# Altium PCB PCB.PcbDoc (part 4 of 7)
Units mm, origin at the board's own origin, x right, y up, seen from the top; angles counter-clockwise.
Board outline 78.8 x 69 mm, 12 copper layers (Top Layer, GND_12, uStrip1, GND_35, Clocks, GND_57, POWER, Slow_Ctrl, GND_810, uStrip2, GND_1012, Bottom Layer), stack 2.926 mm thick; 290 components, 212 nets, 1379 pads, 3418 vias.
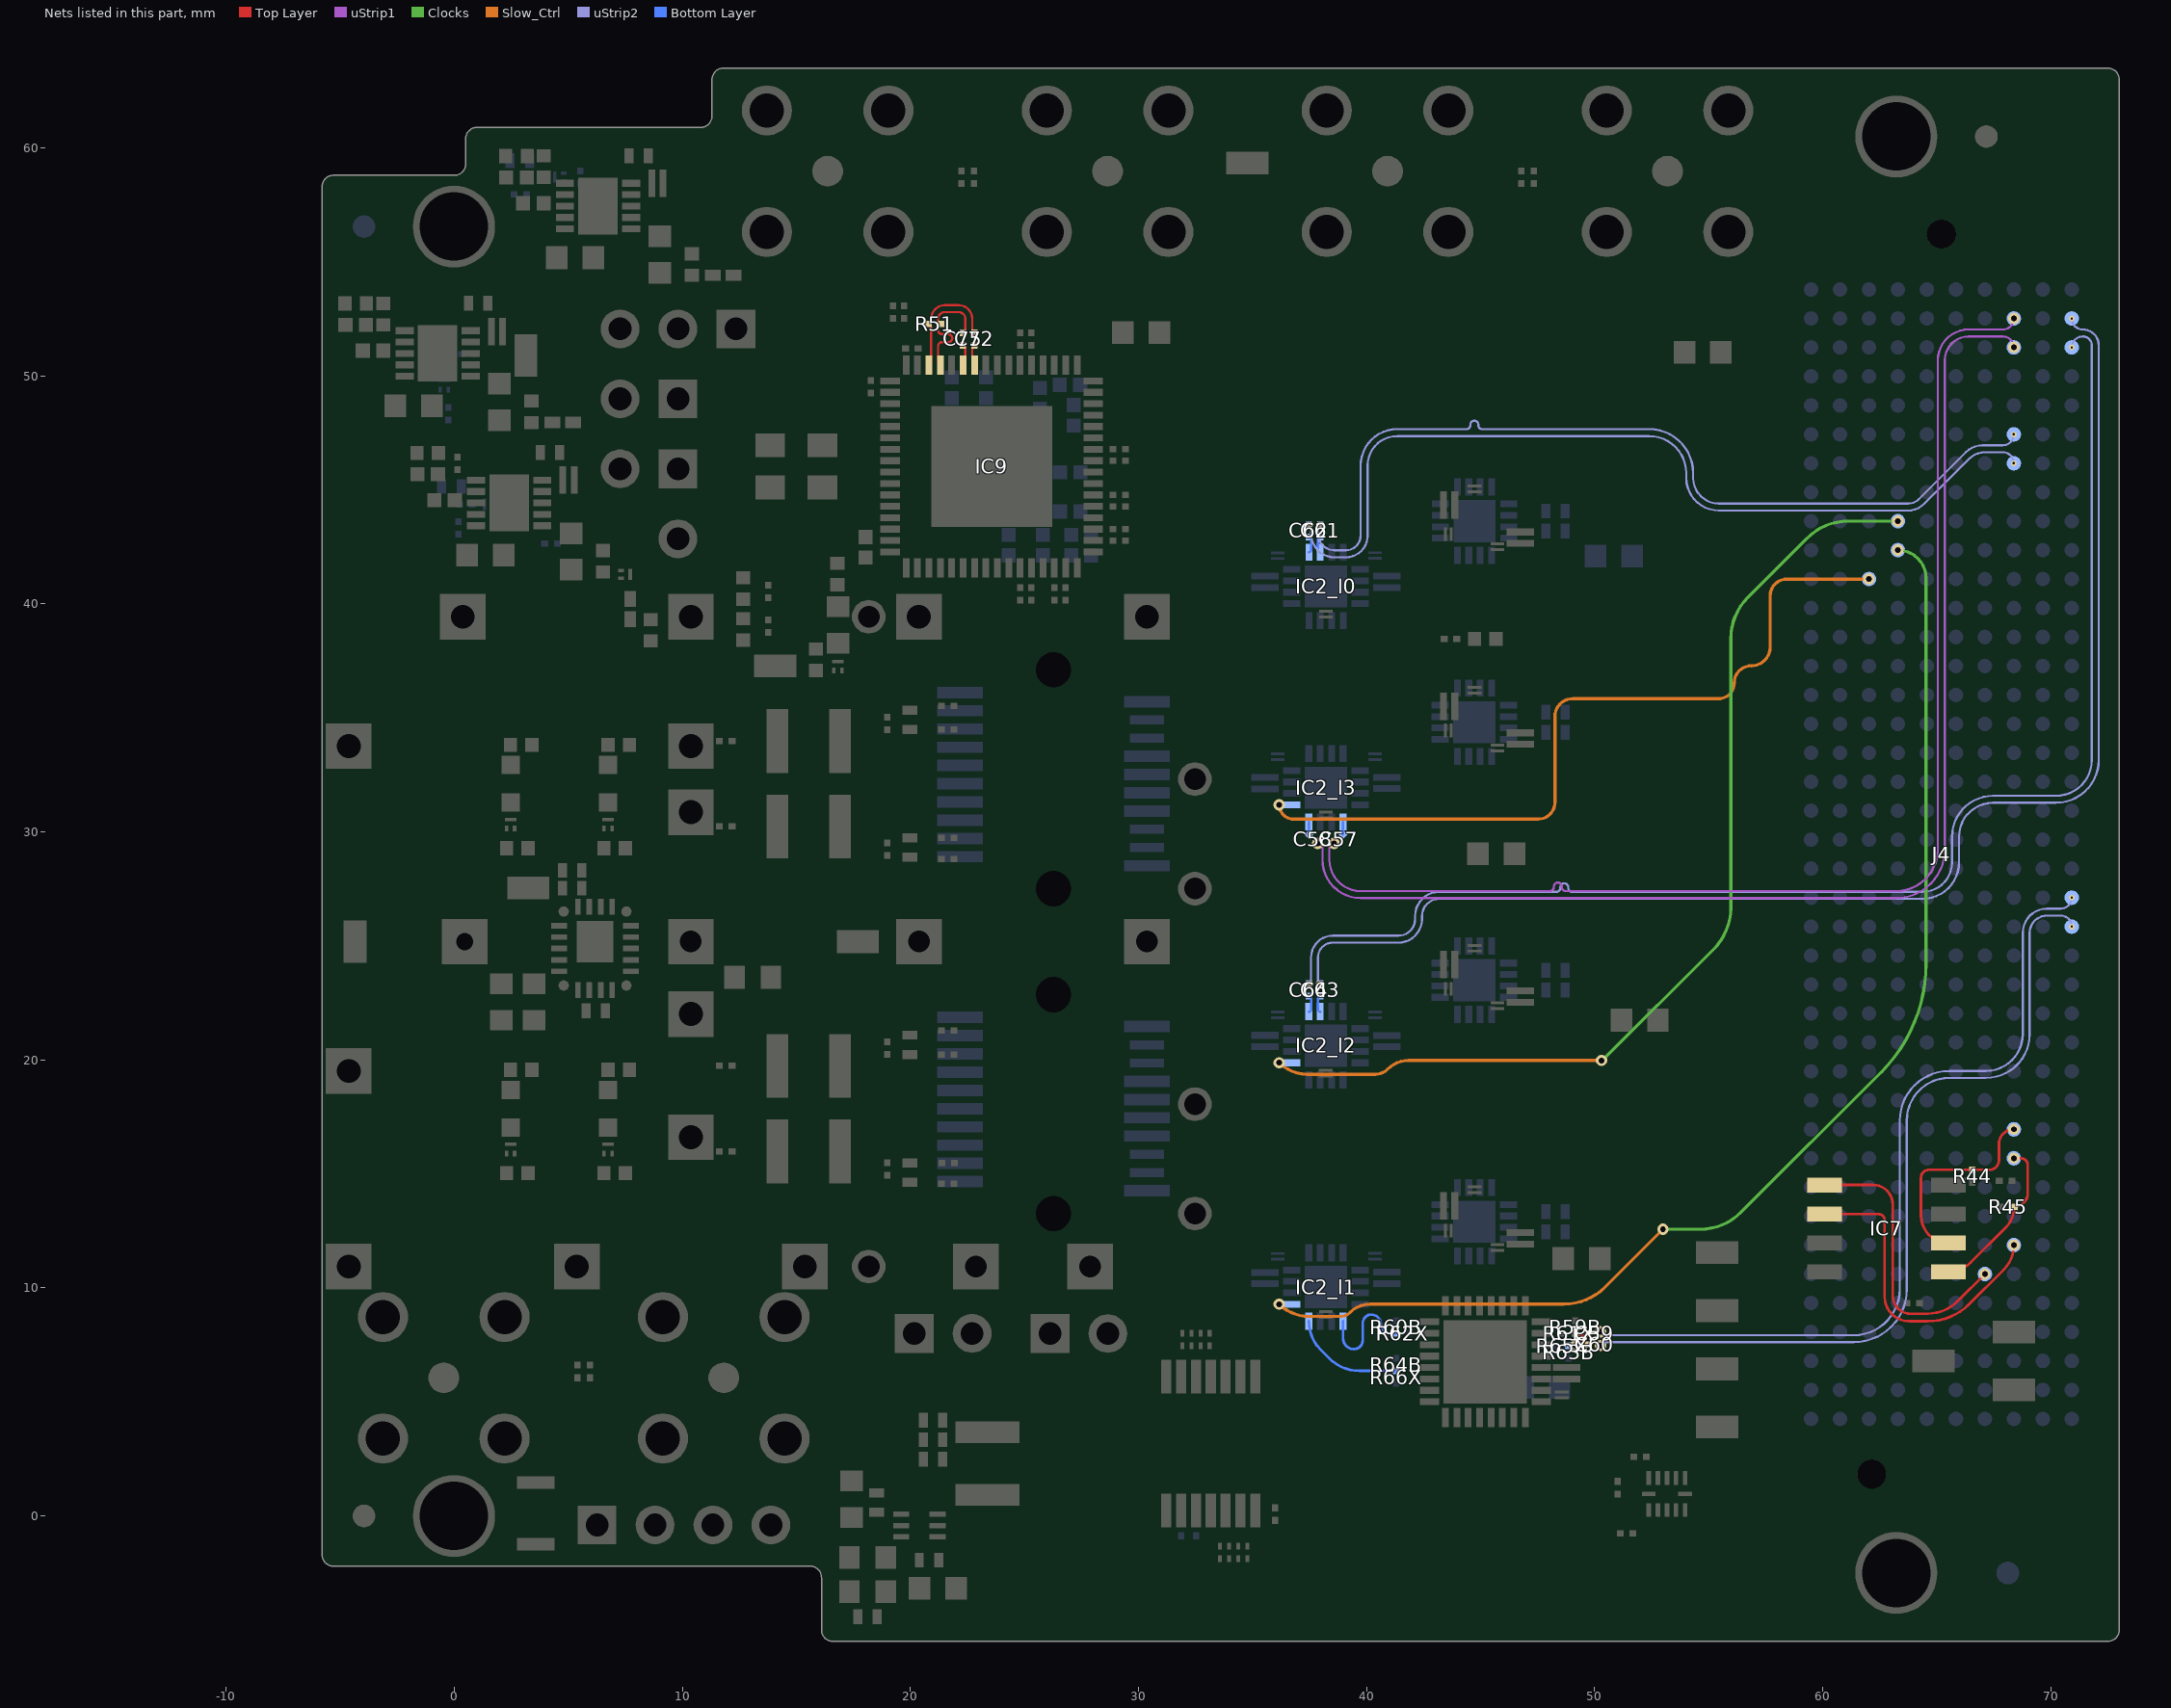
[diagram p13: the nets of this part, all layers, seen from the top]

## Via types
v1: diameter 0.25, hole 0.1, Top Layer to uStrip1, tented both sides, 895 vias
v2: diameter 0.25, hole 0.1, uStrip2 to Bottom Layer, tented both sides, 888 vias
v3: diameter 0.5, hole 0.25, Top Layer to Bottom Layer, tented both sides, 768 vias
v4: diameter 0.5, hole 0.25, Top Layer to Bottom Layer, 545 vias
v5: diameter 0.5, hole 0.25, uStrip1 to uStrip2, tented both sides, 315 vias
v6: diameter 0.584, hole 0.483, Top Layer to Bottom Layer, tented both sides, 6 vias
v7: diameter 0.5, hole 0.25, uStrip1 to uStrip2, 1 vias

## Nets (pads, with @x,y where several pads share a name; then routed paths per layer and width w, separated by ;. In a path a pad name is that pad's centre, name@x,y a point inside that pad or via, vN(x,y) a via of type N, cw(c..) or ccw(c..) an arc to the next point about the centre after c; other vN are vias at no path point) (continued)
EQ1_EN: IC2_l1.5 J4.G10 | length 54.8
  Clocks w0.137: v3(52.994,12.578) 54.623,12.578 ccw(c54.623,15.118) 56.419,13.322 62.554,19.456 ccw(c57.776,24.234) 64.533,24.234 64.533,41.125 ccw(c63.298,41.125) v3(63.298,42.36)
  Slow_Ctrl w0.137: v3(36.173,9.289) ccw(c37.472,10.588) 37.472,8.751 38.841,8.751 ccw(c38.841,9.371) 39.28,8.932 cw(c40.14,8.072) 40.14,9.289 48.653,9.289 ccw(c48.653,11.829) 49.161,9.34 ccw(c48.653,11.829) 50.449,10.033 v3(52.994,12.578)
EQ2_EN: IC2_l2.5 J4.G9 | length 45
  Clocks w0.137: v3@50.326,19.973 55.225,24.872 ccw(c53.429,26.668) 55.969,26.668 55.969,38.486 cw(c58.509,38.486) 56.713,40.282 59.317,42.886 cw(c61.113,41.09) 61.113,43.63 v3(63.298,43.63)
  Slow_Ctrl w0.137: v3(36.173,19.878) ccw(c37.394,21.099) 37.394,19.372 40.378,19.372 ccw(c40.378,20.143) 40.924,19.598 cw(c41.843,18.679) 41.843,19.979 v3(50.307,19.979)
EQ3_EN: IC2_l3.5 J4.H11 | length 34.8
  Slow_Ctrl w0.137: v3(36.173,31.19) ccw(c36.801,31.19) 36.801,30.562 47.519,30.562 ccw(c47.519,31.3) 48.257,31.3 48.257,35.066 cw(c49.032,35.066) 49.032,35.841 55.426,35.841 ccw(c55.426,36.533) 56.118,36.533 cw(c56.873,36.533) 56.873,37.288 ccw(c56.873,38.105) 57.69,38.105 57.69,40.348 cw(c58.432,40.348) 58.432,41.09 v3(62.028,41.09)
FB_IN_N: C75.1 IC9.61 R51.1 | length 5.2
  Top Layer w0.099: IC9.61@21.236,50.553 21.211,50.578 21.211,50.901 21.211,51.304 cw(c21.387,51.304) 21.387,51.481 21.652,51.481 ccw(c21.652,51.657) 21.652,51.834 21.387,51.834 cw(c21.387,52.01) 21.211,52.01 21.211,52.154 R51.1@21.333,52.277 21.211,52.4 21.211,52.498 cw(c21.513,52.498) 21.513,52.8 22.108,52.8 cw(c22.108,52.503) 22.406,52.503 22.406,52.323 22.406,51.996 C75.1@22.309,51.898
FB_IN_P: C72.1 IC9.62 R51.2 | length 5.2
  Top Layer w0.099: IC9.62@20.881,50.553 20.906,50.578 20.906,51.668 20.906,52.154 R51.2@20.783,52.277 20.906,52.4 20.906,52.498 cw(c21.513,52.498) 21.513,53.105 22.108,53.105 cw(c22.108,52.503) 22.711,52.503 22.711,52.197 22.711,51.996 C72.1@22.808,51.898
FB_OUT_N: C75.2 IC9.59 | length 0.7
  Top Layer w0.099: C75.2@22.309,51.348 22.406,51.251 22.406,50.681 IC9.59@22.381,50.656
FB_OUT_P: C72.2 IC9.58 | length 0.7
  Top Layer w0.099: IC9.58@22.736,50.656 22.711,50.681 22.711,51.251 C72.2@22.808,51.348
FMC_GA0: IC7.2 J4.C34 | length 14
  Top Layer w0.117: IC7.2@60.079,13.238 62.459,13.238 cw(c62.459,12.982) 62.715,12.982 62.715,9.607 ccw(c63.783,9.607) 63.783,8.539 64.612,8.539 ccw(c64.612,11.079) 66.408,9.283 67.934,10.809 ccw(c66.863,11.88) v3(68.378,11.88)
FMC_GA1: IC7.1 J4.D35 | length 12.6
  Top Layer w0.117: IC7.1@60.079,14.518 62.208,14.518 cw(c62.208,13.653) 63.073,13.653 63.073,9.647 ccw(c63.846,9.647) 63.846,8.874 64.597,8.874 ccw(c64.597,10.746) 65.92,9.423 v3(67.108,10.61)
FMC_SCL: IC7.6 J4.C30 R44.1 | length 9.1
  Top Layer w0.117: IC7.6@65.503,11.978 cw(c65.503,13.171) 64.309,13.171 64.309,14.838 cw(c64.653,14.838) 64.653,15.182 R44.1@66.552,15.182 67.308,15.182 ccw(c67.308,15.597) 67.723,15.597 67.723,16.306 cw(c68.378,16.306) v3(68.378,16.96)
FMC_SDA: IC7.5 J4.C31 R45.1 | length 7.2
  Top Layer w0.117: IC7.5@65.503,10.708 ccw(c65.503,12.1) 66.487,11.116 68.015,12.643 ccw(c67.093,13.565) R45.1@68.397,13.565 ccw(c68.397,14.158) 68.99,14.158 68.99,15.392 ccw(c68.692,15.392) 68.692,15.69 v3(68.378,15.69)
FPGA_RX0_C_N: C62.1 J4.C7 | length 39.4
  uStrip2 w0.094: v2(37.542,43.484) 37.567,43.459 37.567,43.072 37.567,43.062 ccw(c38.601,43.082) 38.441,42.06 ccw(c38.601,43.082) 38.601,42.048 39.096,42.048 ccw(c39.096,42.996) 40.044,42.996 40.044,46.066 cw(c41.339,46.066) 41.339,47.362 52.392,47.362 cw(c52.392,45.741) 54.013,45.741 54.013,45.529 ccw(c55.443,45.529) 55.443,44.099 63.754,44.099 ccw(c63.754,45.054) 64.429,44.378 66.406,46.355 cw(c67.124,45.637) 67.124,46.653 67.895,46.653 cw(c67.895,46.17) v2(68.378,46.17)
FPGA_RX0_C_P: C61.1 J4.C6 | length 39.3
  uStrip2 w0.094: v2(37.896,43.484) 37.871,43.459 37.871,43.082 ccw(c38.601,43.082) 38.601,42.353 39.096,42.353 ccw(c39.096,42.996) 39.739,42.996 39.739,46.066 cw(c41.339,46.066) 41.339,47.667 43.918,47.667 44.376,47.667 ccw(c44.376,47.841) 44.55,47.841 44.55,47.862 cw(c44.724,47.862) 44.898,47.862 44.898,47.841 ccw(c45.072,47.841) 45.072,47.667 45.467,47.667 52.392,47.667 cw(c52.392,45.741) 54.318,45.741 54.318,45.529 ccw(c55.443,45.529) 55.443,44.403 63.752,44.403 ccw(c63.752,45.057) 64.214,44.595 66.28,46.66 cw(c66.998,45.942) 66.998,46.957 67.895,46.957 ccw(c67.895,47.44) v2(68.378,47.44)
FPGA_RX0_N: C62.2 IC2_l0.9 | length 0.8
  Bottom Layer w0.099: IC2_l0.9@37.469,42.266 ccw(c37.469,42.364) 37.567,42.364 37.567,42.836 ccw(c37.469,42.836) C62.2@37.469,42.934
FPGA_RX0_P: C61.2 IC2_l0.10 | length 0.8
  Bottom Layer w0.099: IC2_l0.10@37.969,42.266 cw(c37.969,42.364) 37.872,42.364 37.872,42.836 cw(c37.969,42.836) C61.2@37.969,42.934
FPGA_RX1_C_N: C64.1 J4.A3 | length 60.9
  uStrip2 w0.094: v2(37.541,23.344) ccw(c37.541,23.368) 37.565,23.368 37.565,24.502 cw(c38.514,24.502) 38.514,25.451 41.396,25.451 ccw(c41.396,26.182) 42.127,26.182 42.127,26.316 cw(c43.182,26.316) 43.182,27.371 48.272,27.371 48.319,27.371 ccw(c48.319,27.545) 48.493,27.545 48.493,27.573 cw(c48.667,27.573) 48.841,27.573 48.841,27.545 ccw(c49.015,27.545) 49.015,27.371 49.484,27.371 49.531,27.371 64.371,27.371 ccw(c64.371,28.671) 65.672,28.671 65.672,29.796 cw(c67.461,29.796) 67.461,31.585 70.225,31.585 ccw(c70.225,33.158) 71.798,33.158 71.798,51.334 ccw(c71.4,51.334) 71.4,51.733 ccw(c71.4,51.25) v2(70.918,51.25)
FPGA_RX1_C_P: C63.1 J4.A2 | length 60.9
  uStrip2 w0.094: v2(37.895,23.344) cw(c37.895,23.368) 37.87,23.368 37.87,24.502 cw(c38.514,24.502) 38.514,25.146 41.396,25.146 ccw(c41.396,26.182) 42.432,26.182 42.432,26.316 cw(c43.182,26.316) 43.182,27.066 64.371,27.066 ccw(c64.371,28.671) 65.977,28.671 65.977,29.796 cw(c67.461,29.796) 67.461,31.28 70.225,31.28 ccw(c70.225,33.158) 72.103,33.158 72.103,51.334 ccw(c71.4,51.334) 71.4,52.037 cw(c71.4,52.52) v2(70.918,52.52)
FPGA_RX1_N: C64.2 IC2_l2.9 | length 0.8
  Bottom Layer w0.099: IC2_l2.9@37.468,22.108 ccw(c37.468,22.205) 37.565,22.205 37.565,22.678 ccw(c37.468,22.678) C64.2@37.468,22.776
FPGA_RX1_P: C63.2 IC2_l2.10 | length 0.8
  Bottom Layer w0.099: IC2_l2.10@37.968,22.108 cw(c37.968,22.205) 37.87,22.205 37.87,22.678 cw(c37.968,22.678) C63.2@37.968,22.776
FPGA_TX0_C_N: C58.1 IC2_l3.4 | length 0.6
  Bottom Layer w0.099: C58.1@37.468,29.881 IC2_l3.4@37.468,30.44
FPGA_TX0_C_P: C57.1 IC2_l3.1 | length 0.6
  Bottom Layer w0.099: C57.1@38.968,29.881 IC2_l3.1@38.968,30.44
FPGA_TX0_N: C58.2 J4.C3 | length 55.6
  uStrip1 w0.094: v2(37.857,29.492) cw(c37.857,29.283) 38.065,29.283 38.065,28.778 ccw(c39.744,28.778) 39.744,27.1 63.213,27.1 ccw(c63.213,29.238) 65.351,29.238 65.351,50.689 cw(c66.395,50.689) 66.395,51.733 67.895,51.733 cw(c67.895,51.25) v5(68.378,51.25)
  other v2: 68.378,51.25
  other v5: 37.857,29.492
FPGA_TX0_P: C57.2 J4.C2 | length 55.6
  uStrip1 w0.094: v2(38.579,29.492) ccw(c38.579,29.283) 38.37,29.283 38.37,28.778 ccw(c39.744,28.778) 39.744,27.405 47.628,27.405 48.037,27.405 ccw(c48.037,27.579) 48.211,27.579 48.211,27.605 cw(c48.385,27.605) 48.559,27.605 48.559,27.579 ccw(c48.733,27.579) 48.733,27.405 49.128,27.405 63.213,27.405 ccw(c63.213,29.238) 65.046,29.238 65.046,50.691 cw(c66.392,50.691) 66.392,52.037 67.895,52.037 ccw(c67.895,52.52) v2(68.378,52.52)
  other v5: 38.579,29.492 68.378,52.52
FPGA_TX1_C_N: C60.1 R63B.2 R65X.2 | length 0.7
  Top Layer w0.099: v3@49.153,7.513 cw(c49.251,7.513) 49.251,7.61 49.614,7.61 cw(c49.614,7.513) C60.1@49.711,7.513
  other v3: 49.155,7.464
FPGA_TX1_C_P: C59.1 R59B.1 R61X.2 | length 0.7
  Top Layer w0.099: R59B.1@49.153,8.013 ccw(c49.251,8.013) 49.251,7.915 49.614,7.915 ccw(c49.614,8.013) C59.1@49.711,8.013
FPGA_TX1_N: C60.2 J4.A23 | length 36.8
  uStrip2 w0.094: v5(50.261,7.476) cw(c50.41,7.476) 50.41,7.624 61.361,7.624 ccw(c61.361,9.949) 63.686,9.949 63.686,17.349 cw(c65.552,17.349) 65.552,19.215 67.155,19.215 ccw(c67.155,21.134) 69.074,21.134 69.074,25.579 cw(c69.827,25.579) 69.827,26.333 70.435,26.333 cw(c70.435,25.85) v2(70.918,25.85)
  other v1: 50.261,7.476
FPGA_TX1_P: C59.2 J4.A22 | length 36.8
  uStrip2 w0.094: v5(50.261,8.078) ccw(c50.41,8.078) 50.41,7.929 61.361,7.929 ccw(c61.361,9.949) 63.381,9.949 63.381,17.349 cw(c65.552,17.349) 65.552,19.52 67.155,19.52 ccw(c67.155,21.134) 68.769,21.134 68.769,25.579 cw(c69.827,25.579) 69.827,26.637 70.435,26.637 ccw(c70.435,27.12) v2(70.918,27.12)
  other v1: 50.261,8.078
FPGA_TX1_PS_N: IC2_l1.4 R64B.1 R66X.2 | length 5
  Bottom Layer w0.117: IC2_l1.4@37.468,8.539 ccw(c39.225,8.539) 37.982,7.297 38.365,6.914 ccw(c39.693,8.242) 39.693,6.364 R64B.1@41.282,6.364
FPGA_TX1_PS_P: IC2_l1.1 R60B.1 R62X.1 | length 5
  Bottom Layer w0.117: IC2_l1.1@38.968,8.539 38.968,7.791 ccw(c39.441,7.791) 39.441,7.318 ccw(c39.441,7.708) 39.831,7.708 39.831,8.456 cw(c40.207,8.456) 40.207,8.831 cw(c40.207,8.417) 40.5,8.71 cw(c40.205,8.415) 40.623,8.415 ccw(c41.025,8.415) 41.025,8.013 R62X.1@41.282,8.013